# Altium PCB MainBoardPCB1.PcbDoc (part 27 of 40)
Units mm, origin at the board's own origin, x right, y up, seen from the top; angles counter-clockwise.
Board outline 258.95 x 308.86 mm, 16 copper layers (L1, L2 (GND), L3 (Sign), L4 (GND), L5 (Sign), L6 (PWR/GND), L7(PWR/GND), L8 (Plane_GND), L9 (PWR/GND), L10 (PWR/GND), L11 (PWR/GND), L12 (Sign), L13 (GND), L14 (Sign), L15 (GND), L16), stack 2.502 mm thick; 2397 components, 1744 nets, 8397 pads, 4112 vias.
Unrouted connection lines stored in the file: 3547.
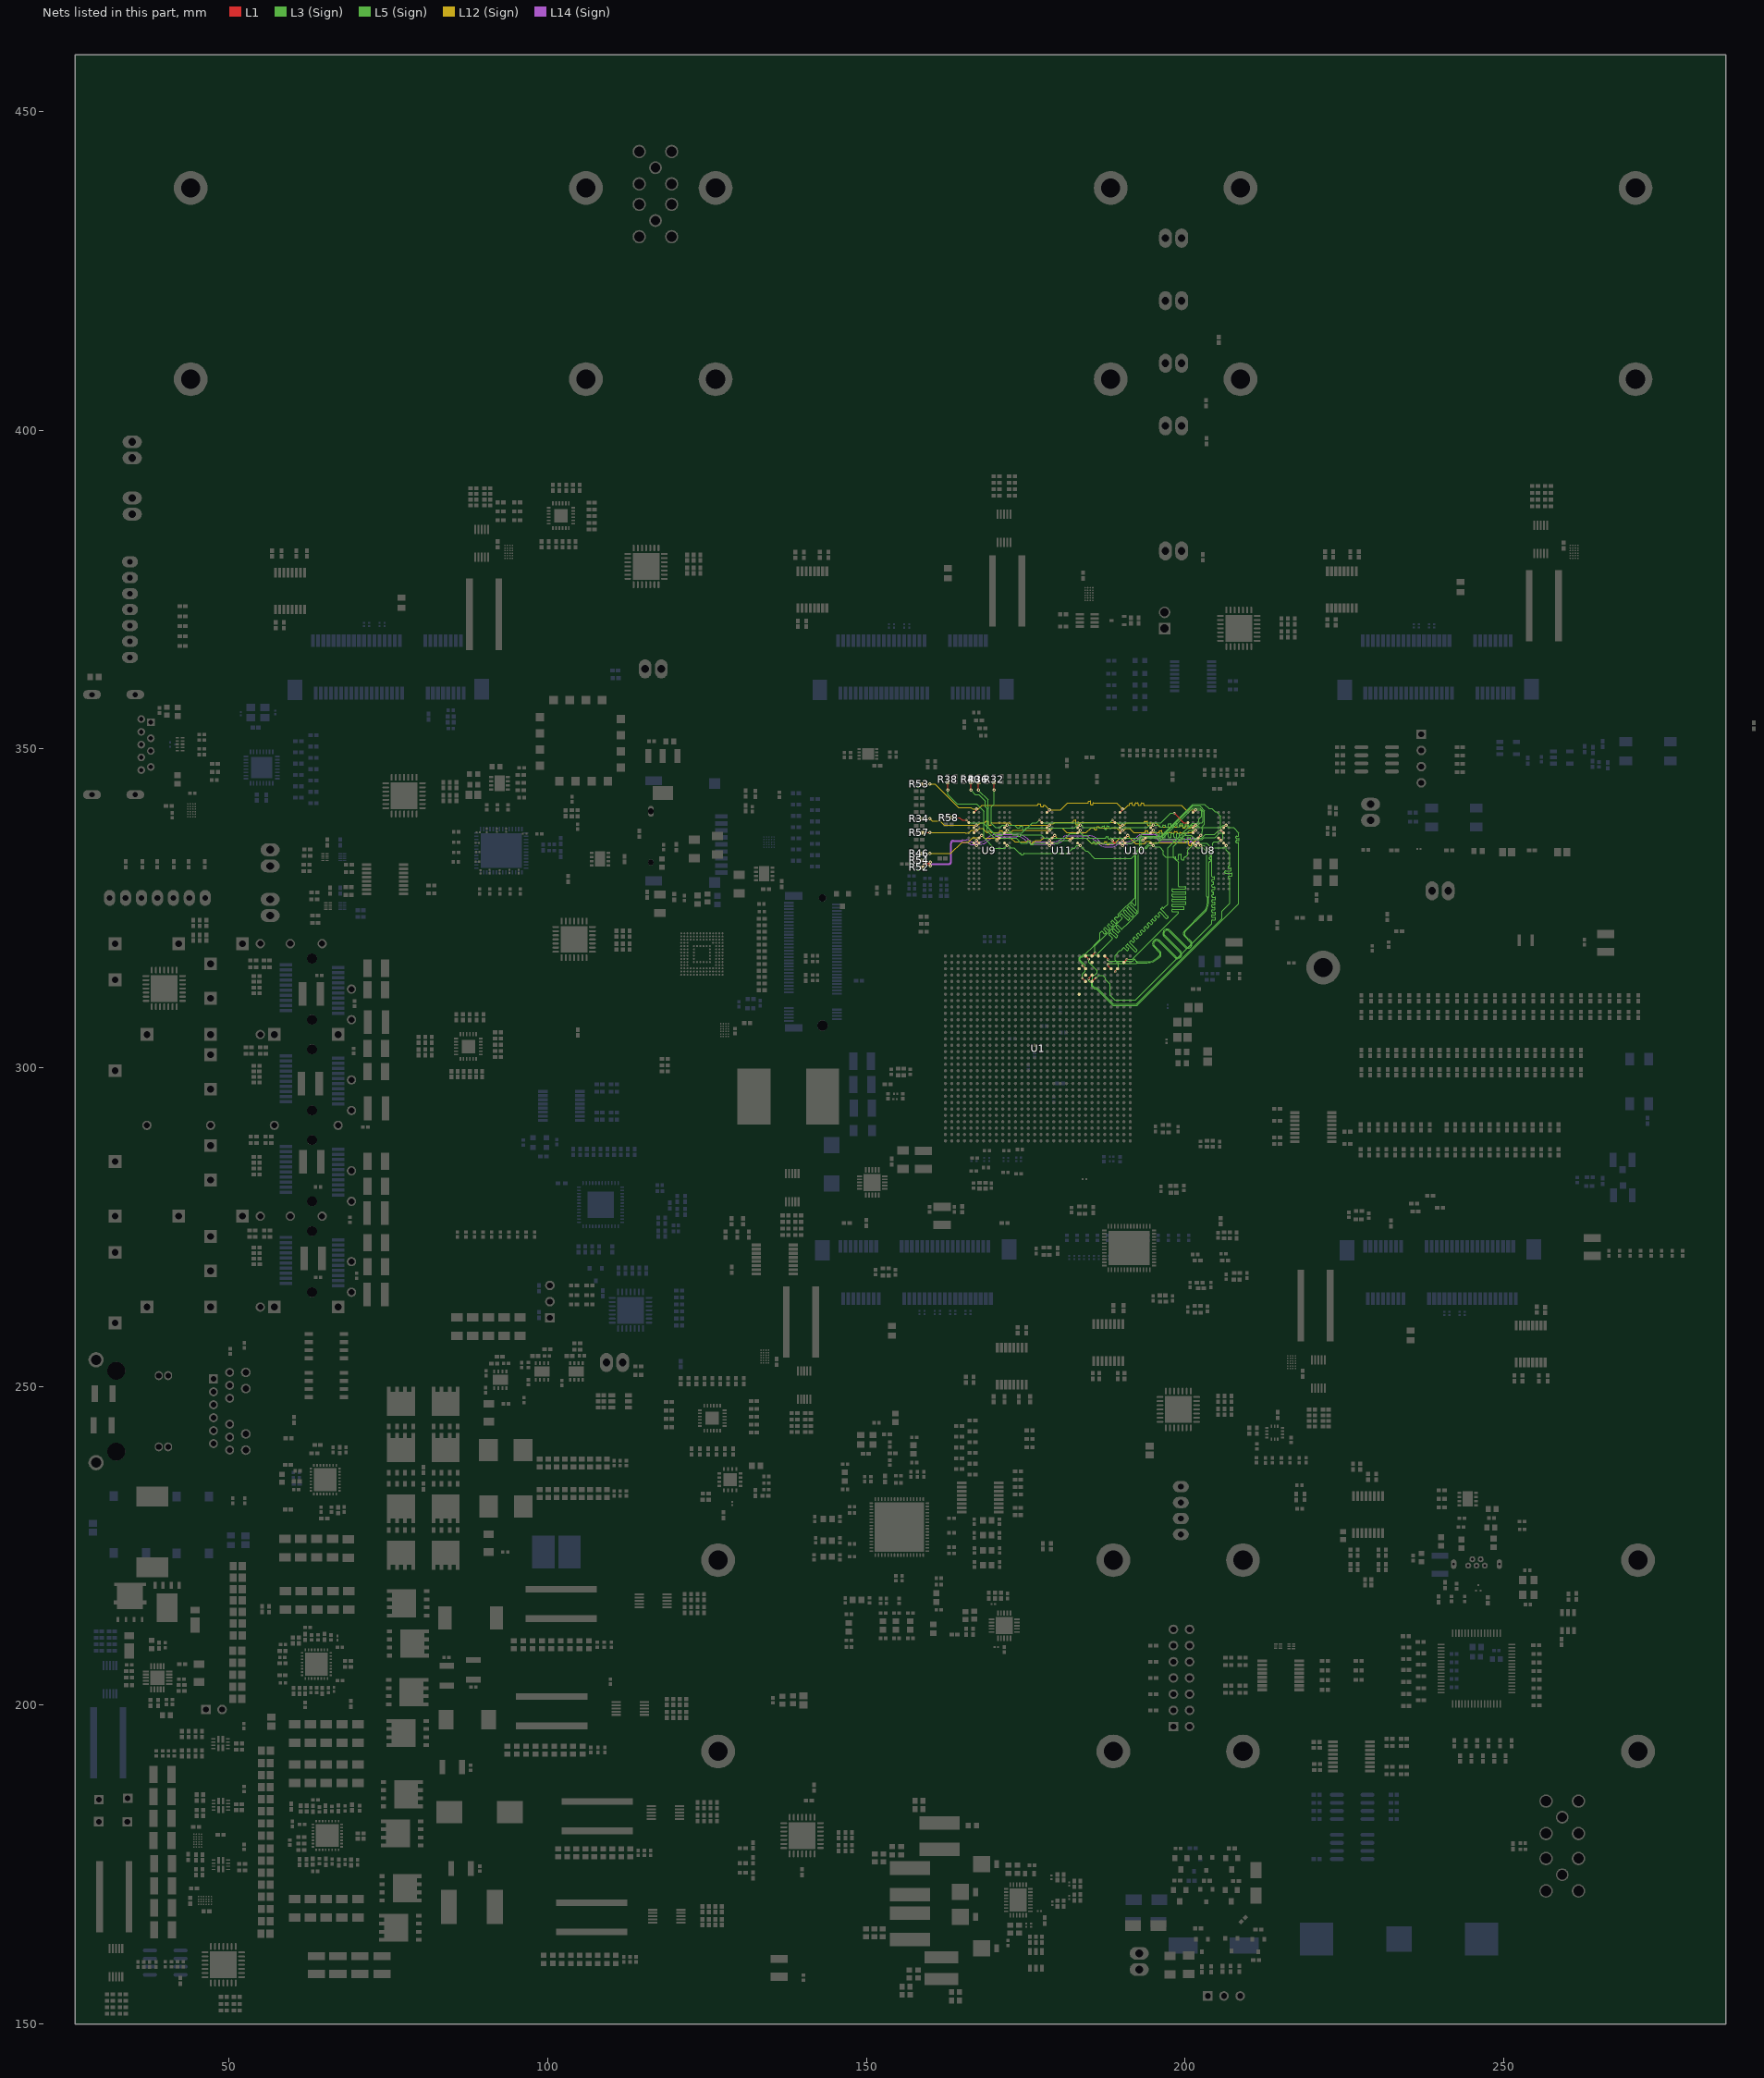
[diagram p27: the nets of this part, all layers, seen from the top]

## Via types
v1: diameter 0.5, hole 0.2, L1 to L16, tented both sides, 1457 vias
v2: diameter 0.35/0/0.35 (per signal layer), hole 0.127, L1 to L3 (Sign), tented both sides, 479 vias
v3: diameter 0.5/0.35/0.35/0.35/0.35/0.35/0.35/0.35/0.35/0.35/0.35/0.35/0.35/0.35/0.35/0.5 (per signal layer), hole 0.15, L1 to L16, tented both sides, 453 vias
v4: diameter 0.5, hole 0.2, L1 to L16, 451 vias
v5: diameter 0.5/0.35/0.35/0.35/0.35/0.35/0.35/0.35/0.35/0.35/0.35/0.35/0.35/0.35/0.35/0.5 (per signal layer), hole 0.2, L1 to L16, tented both sides, 373 vias
v6: diameter 0.8, hole 0.4, L1 to L16, tented both sides, 168 vias
v7: diameter 0.35/0/0.35 (per signal layer), hole 0.127, L1 to L3 (Sign), 138 vias
v8: diameter 2.54, hole 1.02, L1 to L16, 113 vias
v9: diameter 0.5/0/0.5 (per signal layer), hole 0.2, L14 (Sign) to L16, tented both sides, 102 vias
v10: diameter 1.4, hole 0.5, L1 to L16, tented both sides, 80 vias
v11: diameter 0.5, hole 0.2, L3 (Sign) to L6 (PWR/GND), tented both sides, 54 vias
v12: diameter 0.35, hole 0.127, L1 to L2 (GND), tented both sides, 47 vias
v13: diameter 0.4, hole 0.2, L1 to L16, tented both sides, 46 vias
v14: diameter 0.35, hole 0.127, L1 to L16, tented both sides, 16 vias
v15: diameter 0.25, hole 0.2, L1 to L16, 16 vias
v16: diameter 0.5, hole 0.2, L11 (PWR/GND) to L14 (Sign), tented both sides, 16 vias
v17: diameter 0.4, hole 0.2, L1 to L16, 16 vias
v18: diameter 0.3, hole 0.2, L1 to L16, 15 vias
v19: diameter 0.45, hole 0.15, L1 to L16, 12 vias
v20: diameter 0.5/0.35/0.35/0.35/0.35/0.35/0.35/0.35/0.35/0.35/0.35/0.35/0.35/0.35/0.35/0.45 (per signal layer), hole 0.15, L1 to L16, tented both sides, 10 vias
v21: diameter 0.2/0/0.2 (per signal layer), hole 0.1, L1 to L3 (Sign), tented both sides, 9 vias
v22: diameter 0.3, hole 0.127, L14 (Sign) to L16, tented both sides, 8 vias
v23: diameter 0.4, hole 0.1, L1 to L16, 7 vias
v24: diameter 1.15, hole 1.15, L1 to L16, 5 vias
v25: diameter 1.65, hole 1.65, L1 to L16, 5 vias
v26: diameter 0.2, hole 0.1, L1 to L16, 4 vias
v27: diameter 0.4, hole 0.15, L1 to L16, 2 vias
v28: diameter 0.5/0.35/0.35/0.35/0.35/0.35/0.35/0.35/0.35/0.35/0.35/0.35/0.35/0.35/0.35/0.5 (per signal layer), hole 0.15, L1 to L16, 2 vias
v29: diameter 0.35, hole 0.127, L3 (Sign) to L6 (PWR/GND), tented both sides, 2 vias
v30: diameter 0.3, hole 0.127, L15 (GND) to L16, tented both sides, 1 vias
v31: diameter 0.35, hole 0.127, L1 to L2 (GND), 1 vias
v32: diameter 0.5/0.35/0.35/0.35/0.35/0.35/0.35/0.35/0.35/0.35/0.35/0.35/0.35/0.35/0.35/0.5 (per signal layer), hole 0.2, L1 to L16, 1 vias
v33: diameter 0.35/0.35/0.35 (per signal layer), hole 0.127, L1 to L3 (Sign), tented both sides, 1 vias
v34: diameter 0.45/0/0.45 (per signal layer), hole 0.15, L1 to L3 (Sign), tented both sides, 1 vias
v35: diameter 0.45/0/0.45 (per signal layer), hole 0.2, L14 (Sign) to L16, tented both sides, 1 vias

## Nets (pads, with @x,y where several pads share a name; then routed paths per layer and width w, separated by ;. In a path a pad name is that pad's centre, name@x,y a point inside that pad or via, vN(x,y) a via of type N, cw(c..) or ccw(c..) an arc to the next point about the centre after c; other vN are vias at no path point) (continued)
DDR4_A13: R53.1 U1.AH28 U8.T5 U9.T5 U10.T5 U11.T5 | length 100.7
  L1 w0.116: U9.T5@166.876,340.06 167.274,340.459 v28(167.274,340.589) ; U11.T5@178.336,340.06 178.733,340.457 v3(178.735,340.457) ; v2(189.04,315.049) 189.04,315.182 U1.AH28@189.397,315.539 ; U10.T5@189.797,340.06 190.195,340.459 v3(190.195,340.589) ; U8.T5@201.257,340.06 201.653,340.457 v3(201.656,340.457)
  L1 w0.155: R53.1@158.737,344.5 v1(159.982,344.5)
  L12 (Sign) w0.092: 165.251,340.851 166.416,340.851 166.678,340.589 v28(167.274,340.589) 167.571,340.589 168.155,341.173 176.774,341.173 176.81,341.173 ccw(c176.81,341.262) 176.9,341.262 176.9,341.299 cw(c176.989,341.299) 176.989,341.389 177.258,341.389 cw(c177.258,341.299) 177.347,341.299 177.347,341.173 177.347,341.046 ccw(c177.437,341.046) 177.437,340.957 177.706,340.957 ccw(c177.706,341.046) 177.795,341.046 177.795,341.083 cw(c177.885,341.083) 177.885,341.173 178.019,341.173 v3(178.735,340.457) 180.475,340.457 181.559,341.541 184.15,341.541 184.793,341.541 ccw(c184.793,341.61) 184.862,341.61 184.862,341.755 cw(c184.931,341.755) 184.931,341.824 185.139,341.824 cw(c185.139,341.755) 185.208,341.755 185.208,341.541 185.208,341.327 ccw(c185.277,341.327) 185.277,341.258 185.485,341.258 ccw(c185.485,341.327) 185.554,341.327 185.554,341.472 cw(c185.624,341.472) 185.624,341.541 185.727,341.541 189.243,341.541 v3(190.195,340.589) 190.492,340.589 191.076,341.173 191.211,341.173 ccw(c191.211,341.262) 191.3,341.262 191.3,341.434 cw(c191.39,341.434) 191.39,341.523 191.658,341.523 cw(c191.658,341.434) 191.748,341.434 191.748,341.262 ccw(c191.838,341.262) 191.838,341.173 192.106,341.173 ccw(c192.106,341.262) 192.196,341.262 192.196,341.434 cw(c192.285,341.434) 192.285,341.523 192.554,341.523 cw(c192.554,341.434) 192.644,341.434 192.644,341.262 ccw(c192.733,341.262) 192.733,341.173 193.002,341.173 ccw(c193.002,341.262) 193.091,341.262 193.091,341.434 cw(c193.181,341.434) 193.181,341.523 193.45,341.523 cw(c193.45,341.434) 193.539,341.434 193.539,341.262 ccw(c193.629,341.262) 193.629,341.173 194.164,341.173 199.436,341.173 200.152,340.457 v3(201.656,340.457)
  L12 (Sign) w0.151: v1(159.982,344.5) 160.782,344.5 164.431,340.851 165.251,340.851
  L3 (Sign) w0.092: v2(189.04,315.049) 189.04,315.182 189.546,315.688 189.546,316.37 189.04,316.876 189.04,317.636 189.793,318.389 190.017,318.389 190.158,318.529 cw(c190.199,318.571) 190.158,318.612 190.355,318.81 cw(c190.397,318.769) 190.438,318.81 190.855,318.394 ccw(c190.925,318.464) 190.995,318.394 191.136,318.534 ccw(c191.065,318.604) 191.136,318.674 190.719,319.091 cw(c190.761,319.132) 190.719,319.174 190.917,319.372 cw(c190.958,319.33) 191,319.372 192.149,318.222 ccw(c192.22,318.292) 192.29,318.222 192.43,318.362 ccw(c192.36,318.433) 192.43,318.503 191.281,319.652 cw(c191.322,319.694) 191.281,319.735 191.478,319.933 cw(c191.52,319.891) 191.561,319.933 191.795,319.699 ccw(c191.866,319.769) 191.936,319.699 192.076,319.839 ccw(c192.006,319.909) 192.076,319.98 191.842,320.214 cw(c191.884,320.255) 191.842,320.297 192.04,320.494 cw(c192.081,320.453) 192.123,320.494 192.357,320.26 ccw(c192.427,320.33) 192.497,320.26 192.638,320.401 ccw(c192.567,320.471) 192.638,320.541 192.404,320.775 cw(c192.445,320.817) 192.404,320.858 192.601,321.056 cw(c192.643,321.014) 192.684,321.056 192.918,320.822 ccw(c192.989,320.892) 193.059,320.822 193.199,320.962 ccw(c193.129,321.032) 193.199,321.102 192.965,321.337 cw(c193.007,321.378) 192.965,321.42 193.163,321.617 cw(c193.204,321.576) 193.246,321.617 193.48,321.383 ccw(c193.55,321.453) 193.62,321.383 193.761,321.524 ccw(c193.69,321.594) 193.761,321.664 193.526,321.898 cw(c193.568,321.94) 193.526,321.981 193.724,322.179 cw(c193.766,322.137) 193.807,322.179 194.041,321.945 ccw(c194.111,322.015) 194.182,321.945 194.322,322.085 ccw(c194.252,322.155) 194.322,322.225 194.088,322.459 cw(c194.129,322.501) 194.088,322.543 194.285,322.74 cw(c194.327,322.699) 194.369,322.74 194.603,322.506 ccw(c194.673,322.576) 194.743,322.506 194.883,322.646 ccw(c194.813,322.717) 194.883,322.787 194.649,323.021 cw(c194.691,323.062) 194.649,323.104 194.847,323.302 cw(c194.888,323.26) 194.93,323.302 195.164,323.068 ccw(c195.234,323.138) 195.304,323.068 195.445,323.208 ccw(c195.375,323.278) 195.445,323.348 195.211,323.582 cw(c195.252,323.624) 195.211,323.665 195.408,323.863 cw(c195.45,323.821) 195.491,323.863 195.726,323.629 ccw(c195.796,323.699) 195.866,323.629 196.006,323.769 ccw(c195.936,323.84) 196.006,323.91 195.772,324.144 cw(c195.814,324.185) 195.772,324.227 195.97,324.424 cw(c196.011,324.383) 196.053,324.425 197.051,323.427 ccw(c197.121,323.497) 197.191,323.427 197.331,323.567 ccw(c197.261,323.637) 197.331,323.708 196.334,324.705 196.211,324.828 cw(c196.281,324.898) 196.211,324.968 196.351,325.109 cw(c196.421,325.039) 196.492,325.109 196.544,325.056 ccw(c196.614,325.126) 196.685,325.056 196.759,325.131 197.28,325.652 197.28,334.491 201.168,338.379 201.975,338.379 202.135,338.538 202.135,338.99 202.323,339.178 ; v3(201.656,340.457) 202.379,340.457 202.616,340.22 202.616,339.47 202.323,339.178
DDR4_ACT_N: R40.1 U1.AD26 U8.L3 U9.L3 U10.L3 U11.L3 | length 104
  L1 w0.116: v3(170.472,335.657) U9.L3@170.876,336.06 ; v3(181.933,335.657) U11.L3@182.336,336.06 ; U1.AD26@185.397,313.539 185.89,314.033 v2(186.017,314.033) ; v3(193.393,335.657) U10.L3@193.797,336.06 ; U8.L3@205.257,336.06 v20(205.661,335.657)
  L1 w0.155: v1(166.395,343.555) R40.1@166.395,344.799
  L5 (Sign) w0.092: 168.694,341.085 168.694,340.953 168.985,340.662 168.985,337.144 v3(170.472,335.657) 170.824,336.008 173.503,336.008 174.251,335.26 175.057,335.26 175.191,335.26 ccw(c175.191,335.35) 175.281,335.35 175.281,335.407 cw(c175.37,335.407) 175.37,335.497 175.639,335.497 cw(c175.639,335.407) 175.728,335.407 175.728,335.26 175.728,335.13 ccw(c175.818,335.13) 175.818,335.04 176.087,335.04 ccw(c176.087,335.13) 176.176,335.13 176.176,335.171 cw(c176.266,335.171) 176.266,335.26 176.657,335.26 180.028,335.26 180.425,335.657 v3(181.933,335.657) 182.336,336.06 184.472,336.06 185.265,335.267 185.356,335.267 185.46,335.267 ccw(c185.46,335.337) 185.53,335.337 185.53,335.406 cw(c185.599,335.406) 185.599,335.475 185.807,335.475 cw(c185.807,335.406) 185.876,335.406 185.876,335.267 185.876,335.129 ccw(c185.945,335.129) 185.945,335.059 186.153,335.059 ccw(c186.153,335.129) 186.222,335.129 186.222,335.267 186.222,335.406 cw(c186.291,335.406) 186.291,335.475 186.499,335.475 cw(c186.499,335.406) 186.568,335.406 186.568,335.337 ccw(c186.637,335.337) 186.637,335.267 186.715,335.267 191.656,335.267 192.045,335.657 v3(193.393,335.657) 193.816,336.08 195.631,336.08 195.885,335.826 197.417,335.826 198.076,335.826 cw(c198.076,335.737) 198.165,335.737 198.165,335.628 ccw(c198.255,335.628) 198.255,335.539 198.523,335.539 ccw(c198.523,335.628) 198.613,335.628 198.613,335.826 198.613,335.844 cw(c198.702,335.844) 198.702,335.933 198.971,335.933 cw(c198.971,335.844) 199.061,335.844 199.061,335.826 199.061,335.628 ccw(c199.15,335.628) 199.15,335.539 199.419,335.539 ccw(c199.419,335.628) 199.509,335.628 199.509,335.826 199.509,335.844 cw(c199.598,335.844) 199.598,335.933 199.867,335.933 cw(c199.867,335.844) 199.956,335.844 199.956,335.826 199.956,335.628 ccw(c200.046,335.628) 200.046,335.539 200.315,335.539 ccw(c200.315,335.628) 200.404,335.628 200.404,335.826 200.404,336.024 cw(c200.494,336.024) 200.494,336.113 200.762,336.113 cw(c200.762,336.024) 200.852,336.024 200.852,335.916 ccw(c200.941,335.916) 200.941,335.826 201.3,335.826 201.524,335.826 202.667,335.826 202.971,336.131 204.711,336.131 205.41,336.829 205.765,336.829 205.974,336.62 205.974,335.978 205.661,335.664 v20(205.661,335.657)
  L5 (Sign) w0.151: v1(166.395,343.555) 167.071,342.879 167.648,342.879 168.694,341.833 168.694,341.085
  L3 (Sign) w0.092: v2(186.017,314.033) 186.498,314.514 187.085,314.514 187.528,314.071 187.528,313.862 188.205,313.185 188.205,313.181 188.227,313.16 188.227,311.353 188.962,310.618 192.216,310.618 204.202,322.604 204.202,322.802 204.202,323.1 cw(c204.301,323.1) 204.301,323.199 204.674,323.199 ccw(c204.674,323.299) 204.774,323.299 204.774,323.497 ccw(c204.674,323.497) 204.674,323.596 204.301,323.596 cw(c204.301,323.696) 204.202,323.696 204.202,323.894 cw(c204.301,323.894) 204.301,323.993 204.674,323.993 ccw(c204.674,324.093) 204.774,324.093 204.774,324.291 ccw(c204.674,324.291) 204.674,324.39 204.301,324.39 cw(c204.301,324.49) 204.202,324.49 204.202,324.688 cw(c204.301,324.688) 204.301,324.787 204.6,324.787 ccw(c204.6,324.887) 204.699,324.887 204.699,325.085 ccw(c204.6,325.085) 204.6,325.184 204.301,325.184 cw(c204.301,325.284) 204.202,325.284 204.202,325.482 cw(c204.301,325.482) 204.301,325.581 204.6,325.581 ccw(c204.6,325.681) 204.699,325.681 204.699,325.879 ccw(c204.6,325.879) 204.6,325.978 204.301,325.978 cw(c204.301,326.078) 204.202,326.078 204.202,326.276 cw(c204.301,326.276) 204.301,326.375 204.674,326.375 ; 204.674,326.375 ccw(c204.674,326.475) 204.774,326.475 204.774,326.673 ccw(c204.674,326.673) 204.674,326.772 204.301,326.772 cw(c204.301,326.872) 204.202,326.872 204.202,327.07 cw(c204.301,327.07) 204.301,327.169 204.386,327.169 ccw(c204.386,327.269) 204.486,327.269 204.486,327.467 ccw(c204.386,327.467) 204.386,327.566 204.301,327.566 cw(c204.301,327.666) 204.202,327.666 204.202,327.864 cw(c204.301,327.864) 204.301,327.963 204.579,327.963 ccw(c204.579,328.063) 204.678,328.063 204.678,328.261 ccw(c204.579,328.261) 204.579,328.36 204.301,328.36 cw(c204.301,328.46) 204.202,328.46 204.202,328.658 cw(c204.301,328.658) 204.301,328.757 204.392,328.757 ccw(c204.392,328.857) 204.491,328.857 204.491,329.055 ccw(c204.392,329.055) 204.392,329.154 204.301,329.154 cw(c204.301,329.254) 204.202,329.254 204.202,329.452 cw(c204.301,329.452) 204.301,329.551 204.56,329.551 ccw(c204.56,329.651) 204.659,329.651 204.659,329.849 ccw(c204.56,329.849) 204.56,329.948 204.301,329.948 cw(c204.301,330.048) 204.202,330.048 204.202,332.168 204.202,334.623 204.349,334.771 204.349,335.21 204.584,335.445 205.207,335.445 205.418,335.657 v20(205.661,335.657)
DDR4_ALERT_N: R58.1 U1.AB24 U8.P6 U9.P6 U10.P6 U11.P6 | length 42.4
  L1 w0.112: 165.251,338.856 v2(165.665,338.856) ; U9.P6@166.061,338.46 U9.P6@166.076,338.46
  L1 w0.116: v2(165.665,338.856) U9.P6@166.061,338.46 ; v2@177.125,338.856 U11.P6@177.529,338.453 ; v2(188.586,338.856) U10.P6@188.989,338.453 ; v2(198.298,339.928) 199.766,338.46 U8.P6@200.457,338.46
  L1 w0.155: R58.1@163.36,339.242 164.63,339.242 165.016,338.856 165.251,338.856
  L3 (Sign) w0.092: v2(165.665,338.856) 166.061,338.46 168.322,338.46 169.953,336.829 174.409,336.829 176.04,338.46 176.721,338.46
  L3 (Sign) w0.116: 176.721,338.46 v2(177.117,338.857) 177.514,338.46 188.189,338.46 v2(188.586,338.856) 188.982,338.46 196.259,338.46 197.727,339.928 v2(198.298,339.928)
DDR4_BA0: R32.1 U1.AD27 U8.N2 U9.N2 U10.N2 U11.N2 | length 102.4
  L1 w0.116: U9.N2@171.676,337.66 v3(172.079,338.064) ; U11.N2@183.136,337.66 v3(183.54,338.064) ; v2(184.912,313.919) 184.912,314.054 U1.AD27@185.397,314.539 ; U10.N2@194.597,337.66 v3(195,338.064) ; U8.N2@206.057,337.66 v20(206.439,338.042)
  L1 w0.155: v1(170.02,343.555) R32.1@170.02,344.799
  L5 (Sign) w0.092: 169.765,341.085 169.569,340.89 169.569,338.367 170.243,337.693 170.626,337.693 170.996,337.693 171.367,338.064 v3(172.079,338.064) 173.24,338.064 173.687,337.617 173.876,337.617 174.01,337.617 ccw(c174.01,337.706) 174.1,337.706 174.1,337.818 cw(c174.189,337.818) 174.189,337.907 174.458,337.907 cw(c174.458,337.818) 174.547,337.818 174.547,337.617 174.547,337.416 ccw(c174.637,337.416) 174.637,337.326 174.906,337.326 ccw(c174.906,337.416) 174.995,337.416 174.995,337.527 cw(c175.085,337.527) 175.085,337.617 175.927,337.617 182.674,337.617 183.122,338.064 v3(183.54,338.064) 183.822,338.064 183.909,337.977 183.909,337.857 184.098,337.668 186.347,337.668 186.968,337.668 ccw(c186.968,337.737) 187.037,337.737 187.037,337.823 cw(c187.106,337.823) 187.106,337.892 187.314,337.892 cw(c187.314,337.823) 187.383,337.823 187.383,337.668 187.383,337.512 ccw(c187.453,337.512) 187.453,337.443 187.66,337.443 ccw(c187.66,337.512) 187.73,337.512 187.73,337.668 187.73,337.823 cw(c187.799,337.823) 187.799,337.892 188.006,337.892 cw(c188.006,337.823) 188.076,337.823 188.076,337.668 188.076,337.633 ccw(c188.145,337.633) 188.145,337.563 188.353,337.563 ccw(c188.353,337.633) 188.422,337.633 cw(c188.457,337.633) 188.457,337.668 188.595,337.668 194.056,337.668 194.452,338.064 v3(195,338.064) 195.313,338.064 195.952,338.064 cw(c195.952,337.974) 196.041,337.974 196.041,337.85 ccw(c196.131,337.85) 196.131,337.761 196.399,337.761 ccw(c196.399,337.85) 196.489,337.85 196.489,337.974 cw(c196.578,337.974) 196.578,338.064 196.847,338.064 cw(c196.847,337.974) 196.937,337.974 196.937,337.85 ccw(c197.026,337.85) 197.026,337.761 197.295,337.761 ccw(c197.295,337.85) 197.384,337.85 197.384,338.064 197.384,338.223 cw(c197.474,338.223) 197.474,338.312 197.743,338.312 cw(c197.743,338.223) 197.832,338.223 197.832,338.064 197.832,337.85 ccw(c197.922,337.85) 197.922,337.761 198.191,337.761 ccw(c198.191,337.85) 198.28,337.85 198.28,338.064 198.28,338.223 cw(c198.37,338.223) 198.37,338.312 198.638,338.312 cw(c198.638,338.223) 198.728,338.223 198.728,338.064 198.728,337.85 ccw(c198.817,337.85) 198.817,337.761 199.086,337.761 ccw(c199.086,337.85) 199.176,337.85 199.176,338.064 199.176,338.223 cw(c199.265,338.223) 199.265,338.312 199.534,338.312 cw(c199.534,338.223) 199.623,338.223 199.623,338.064 199.623,337.85 ccw(c199.713,337.85) 199.713,337.761 199.982,337.761 ccw(c199.982,337.85) 200.071,337.85 200.071,338.064 200.071,338.223 cw(c200.161,338.223) 200.161,338.312 200.43,338.312 cw(c200.43,338.223) 200.519,338.223 200.519,338.064 200.519,337.85 ccw(c200.609,337.85) 200.609,337.761 200.877,337.761 ccw(c200.877,337.85) 200.967,337.85 200.967,337.974 cw(c201.056,337.974) 201.056,338.064 201.191,338.064 201.587,337.668 201.752,337.668 ccw(c201.752,337.727) 201.811,337.727 cw(c201.9,337.727) 201.9,337.817 202.169,337.817 cw(c202.169,337.727) 202.258,337.727 ccw(c202.318,337.727) 202.318,337.668 202.654,337.668 205.646,337.668 206.02,338.042 v20(206.439,338.042)
  L5 (Sign) w0.151: 169.765,341.085 170.02,341.341 v1(170.02,343.555)
  L3 (Sign) w0.092: v2(184.912,313.919) 184.912,313.655 185.312,313.255 185.312,312.828 185.749,312.391 185.756,312.398 186.088,312.398 188.679,309.807 192.491,309.807 192.53,309.846 192.538,309.846 208.407,325.715 208.407,334.442 208.407,335.21 ccw(c208.32,335.21) 208.32,335.297 208.095,335.297 cw(c208.095,335.383) 208.008,335.383 208.008,335.557 cw(c208.095,335.557) 208.095,335.643 208.407,335.643 ccw(c208.407,335.708) 208.472,335.708 208.472,335.925 ccw(c208.407,335.925) 208.407,335.989 208.095,335.989 cw(c208.095,336.076) 208.008,336.076 208.008,336.249 cw(c208.095,336.249) 208.095,336.336 208.32,336.336 ccw(c208.32,336.422) 208.407,336.422 208.407,336.682 208.407,336.855 207.582,337.68 206.8,337.68 v20(206.439,338.042)
DDR4_BA1: R34.1 U1.AC26 U8.N5 U9.N5 U10.N5 U11.N5 | length 99
  L1 w0.116: U9.N5@166.876,337.66 167.272,338.057 v28(167.275,338.057) ; U11.N5@178.336,337.66 178.733,338.057 v3(178.735,338.057) ; v2(183.91,314.027) U1.AC26@184.397,313.539 ; U10.N5@189.797,337.66 190.193,338.057 v3(190.195,338.057) ; U8.N5@201.257,337.66 201.653,338.057 v3(201.656,338.057)
  L1 w0.155: R34.1@158.737,339.055 v1(159.982,339.056)
  L12 (Sign) w0.092: 165.251,338.057 166.745,338.057 v28(167.275,338.057) 167.511,338.057 167.915,338.46 168.465,338.46 168.6,338.46 ccw(c168.6,338.55) 168.689,338.55 168.689,338.564 cw(c168.779,338.564) 168.779,338.654 169.048,338.654 cw(c169.048,338.564) 169.137,338.564 169.137,338.46 169.137,338.144 ccw(c169.227,338.144) 169.227,338.054 169.495,338.054 ccw(c169.495,338.144) 169.585,338.144 169.585,338.371 cw(c169.675,338.371) 169.675,338.46 170.345,338.46 172.412,338.46 172.816,338.057 v3(178.735,338.057) 178.981,338.303 179.327,338.303 179.402,338.378 179.413,338.378 179.515,338.48 181.75,338.48 182.479,338.48 ccw(c182.479,338.55) 182.548,338.55 182.548,338.785 cw(c182.617,338.785) 182.617,338.854 182.825,338.854 cw(c182.825,338.785) 182.894,338.785 182.894,338.48 182.894,338.176 ccw(c182.963,338.176) 182.963,338.107 183.171,338.107 ccw(c183.171,338.176) 183.24,338.176 183.24,338.411 cw(c183.31,338.411) 183.31,338.48 183.413,338.48 189.243,338.48 189.666,338.057 v3(190.195,338.057) 190.458,338.057 190.805,338.404 191.783,338.404 193.558,338.404 ccw(c193.558,338.494) 193.648,338.494 193.648,338.57 cw(c193.737,338.57) 193.737,338.659 194.006,338.659 cw(c194.006,338.57) 194.096,338.57 194.096,338.404 194.096,338.145 ccw(c194.185,338.145) 194.185,338.055 194.454,338.055 ccw(c194.454,338.145) 194.543,338.145 194.543,338.315 cw(c194.633,338.315) 194.633,338.404 194.767,338.404 195.389,338.404 195.986,337.807 198.869,337.807 199.09,337.807 ccw(c199.09,337.87) 199.153,337.87 cw(c199.242,337.87) 199.242,337.96 199.511,337.96 cw(c199.511,337.87) 199.601,337.87 199.601,337.807 199.601,337.744 ccw(c199.69,337.744) 199.69,337.655 199.959,337.655 ccw(c199.959,337.744) 200.049,337.744 200.049,337.807 200.049,337.87 cw(c200.138,337.87) 200.138,337.96 200.407,337.96 cw(c200.407,337.87) 200.496,337.87 200.496,337.807 200.496,337.744 ccw(c200.586,337.744) 200.586,337.655 200.855,337.655 ccw(c200.855,337.744) 200.944,337.744 cw(c201.007,337.744) 201.007,337.807 201.168,337.807 201.418,338.057 v3(201.656,338.057)
  L12 (Sign) w0.151: v1(159.982,339.056) 160.336,338.702 161.577,338.702 162.221,338.057 165.251,338.057
  L3 (Sign) w0.092: v2(183.91,314.027) 183.91,314.68 184.362,315.132 184.362,316.073 183.563,316.872 183.563,317.185 183.751,317.373 183.934,317.373 184.164,317.603 184.62,317.603 184.723,317.707 185.751,317.707 ; 185.751,317.706 186.114,317.706 186.535,318.126 188.044,319.659 188.084,319.7 188.536,320.159 188.606,320.23 ccw(c188.535,320.299) 188.605,320.37 188.073,320.894 cw(c188.143,320.964) 188.072,321.034 188.211,321.175 cw(c188.282,321.106) 188.352,321.176 188.954,320.583 189.115,320.425 ccw(c189.185,320.496) 189.255,320.426 189.395,320.567 ccw(c189.324,320.637) 189.393,320.708 189.232,320.866 188.634,321.455 cw(c188.704,321.526) 188.633,321.595 188.773,321.737 cw(c188.843,321.667) 188.913,321.738 189.44,321.219 ccw(c189.51,321.29) 189.581,321.22 189.72,321.361 ccw(c189.649,321.431) 189.719,321.502 189.196,322.017 cw(c189.266,322.087) 189.195,322.157 189.334,322.298 cw(c189.405,322.229) 189.474,322.299 189.997,321.785 ccw(c190.067,321.855) 190.138,321.786 190.346,321.998 190.907,322.567 192.661,324.322 192.661,333.733 193.022,334.093 193.022,334.211 193.239,334.428 193.264,334.428 193.264,334.453 193.633,334.453 194.441,335.26 195.71,335.26 201.227,340.778 202.345,340.778 202.857,340.266 202.857,338.633 202.667,338.442 202.383,338.442 201.998,338.057 v3(201.656,338.057)
DDR4_BG0: R36.1 U1.AC28 U8.M2 U9.M2 U10.M2 U11.M2 | length 104.5
  L1 w0.116: U9.M2@171.676,336.86 v3(172.079,337.264) ; U11.M2@183.136,336.86 v3(183.54,337.264) ; v2(183.909,316.027) U1.AC28@184.397,315.539 ; U10.M2@194.597,336.86 v3(195,337.264) ; v20(205.684,337.233) U8.M2@206.057,336.86 U8.M2@206.088,336.829
  L1 w0.155: v1(167.603,343.555) R36.1@167.603,344.8
  L5 (Sign) w0.092: 169.102,341.085 169.102,340.891 169.177,340.816 169.177,337.543 170.231,336.488 171.303,336.488 v3(172.079,337.264) 172.324,337.264 173.043,336.545 173.609,336.545 173.708,336.545 cw(c173.708,336.445) 173.807,336.445 173.807,336.406 ccw(c173.907,336.406) 173.907,336.307 174.105,336.307 ccw(c174.105,336.406) 174.204,336.406 174.204,336.445 cw(c174.304,336.445) 174.304,336.545 175.12,336.545 177.437,336.545 177.921,336.06 181.217,336.06 181.292,336.136 181.922,336.766 183.042,336.766 v3(183.54,337.264) 183.54,336.919 183.998,336.461 184.595,336.461 184.996,336.06 186.741,336.06 187.533,336.06 ccw(c187.533,336.13) 187.603,336.13 187.603,336.176 cw(c187.672,336.176) 187.672,336.245 187.879,336.245 cw(c187.879,336.176) 187.949,336.176 187.949,336.06 187.949,335.991 ccw(c188.018,335.991) 188.018,335.922 188.226,335.922 ccw(c188.226,335.991) 188.295,335.991 cw(c188.364,335.991) 188.364,336.06 188.468,336.06 192.677,336.06 193.383,336.766 194.502,336.766 v3(195,337.264) 195.79,336.474 195.925,336.474 ccw(c195.925,336.563) 196.014,336.563 196.014,336.726 cw(c196.104,336.726) 196.104,336.816 196.373,336.816 cw(c196.373,336.726) 196.462,336.726 196.462,336.474 196.462,336.221 ccw(c196.552,336.221) 196.552,336.131 196.82,336.131 ccw(c196.82,336.221) 196.91,336.221 196.91,336.474 196.91,336.65 cw(c197,336.65) 197,336.739 197.268,336.739 cw(c197.268,336.65) 197.358,336.65 197.358,336.474 197.358,336.221 ccw(c197.447,336.221) 197.447,336.131 197.716,336.131 ccw(c197.716,336.221) 197.806,336.221 197.806,336.474 197.806,336.65 cw(c197.895,336.65) 197.895,336.739 198.164,336.739 cw(c198.164,336.65) 198.253,336.65 198.253,336.474 198.253,336.221 ccw(c198.343,336.221) 198.343,336.131 198.612,336.131 ccw(c198.612,336.221) 198.701,336.221 198.701,336.474 198.701,336.65 cw(c198.791,336.65) 198.791,336.739 199.059,336.739 cw(c199.059,336.65) 199.149,336.65 199.149,336.474 199.149,336.221 ccw(c199.239,336.221) 199.239,336.131 199.507,336.131 ccw(c199.507,336.221) 199.597,336.221 199.597,336.474 199.597,336.726 cw(c199.686,336.726) 199.686,336.816 199.955,336.816 cw(c199.955,336.726) 200.045,336.726 200.045,336.563 ccw(c200.134,336.563) 200.134,336.474 200.952,336.474 200.965,336.474 201.378,336.061 202.045,336.061 202.619,336.061 203.161,336.602 204.649,336.602 205.28,337.233 v20(205.684,337.233)
  L5 (Sign) w0.151: v1(167.603,343.555) 167.603,343.534 169.102,342.035 169.102,341.085
  L3 (Sign) w0.092: v2(183.909,316.027) 183.909,316.254 183.371,316.792 183.371,317.264 183.672,317.565 183.854,317.565 184.084,317.795 184.327,317.795 185.692,319.16 185.692,319.238 186.638,320.183 186.638,321.172 186.846,321.38 cw(c186.916,321.309) 186.986,321.38 187.332,321.033 ccw(c187.403,321.103) 187.473,321.033 187.613,321.173 ccw(c187.543,321.244) 187.613,321.314 187.267,321.66 cw(c187.337,321.731) 187.267,321.801 187.407,321.941 cw(c187.477,321.871) 187.547,321.941 187.894,321.595 ccw(c187.964,321.665) 188.034,321.595 188.175,321.735 ccw(c188.104,321.805) 188.175,321.875 187.828,322.222 cw(c187.898,322.292) 187.828,322.362 ; 187.828,322.362 187.968,322.503 cw(c188.039,322.432) 188.109,322.503 188.455,322.156 ccw(c188.526,322.226) 188.596,322.156 188.736,322.296 ccw(c188.666,322.367) 188.736,322.437 188.389,322.783 cw(c188.46,322.853) 188.389,322.924 188.53,323.064 cw(c188.6,322.994) 188.67,323.064 189.017,322.717 ccw(c189.087,322.788) 189.157,322.717 189.298,322.858 ccw(c189.227,322.928) 189.298,322.998 188.951,323.345 cw(c189.021,323.415) 188.951,323.485 189.091,323.625 cw(c189.161,323.555) 189.232,323.625 189.277,323.58 ccw(c189.347,323.651) 189.417,323.58 189.557,323.721 ccw(c189.487,323.791) 189.557,323.861 189.512,323.906 cw(c189.583,323.976) 189.512,324.047 189.583,324.117 192.129,326.663 192.129,333.743 192.638,334.252 192.638,334.484 192.862,334.708 192.862,335.892 193.266,336.296 196.202,336.296 201.206,341.3 203.073,341.3 203.733,340.639 204.224,340.639 204.72,340.143 204.903,340.143 205.58,339.466 205.58,337.579 205.621,337.538 205.621,337.296 v20(205.684,337.233)
DDR4_BG1: U1.AC27
DDR4_CAS: R57.1 U1.AJ29 U8.M5 U9.M5 U10.M5 U11.M5 | length 98.2
  L1 w0.116: U9.M5@166.876,336.86 167.272,337.257 v3(167.275,337.257) ; U11.M5@178.336,336.86 178.733,337.257 v3(178.735,337.257) ; U10.M5@189.797,336.86 190.193,337.257 v3(190.195,337.257) ; U1.AJ29@190.397,316.539 v2(190.884,317.027) ; U8.M5@201.257,336.86 201.259,336.86 v3(201.656,337.257)
  L1 w0.155: R57.1@158.737,336.878 v1(159.982,336.878)
  L12 (Sign) w0.092: 165.251,336.878 165.496,336.878 165.519,336.855 166.07,336.855 166.472,337.257 166.72,337.257 v3(167.275,337.257) 167.486,337.257 167.807,337.578 168.208,337.578 168.878,336.907 169.013,336.907 ccw(c169.013,336.997) 169.102,336.997 169.102,337.062 cw(c169.192,337.062) 169.192,337.152 169.46,337.152 cw(c169.46,337.062) 169.55,337.062 169.55,336.997 ccw(c169.64,336.997) 169.64,336.907 169.672,336.907 170.688,336.907 170.822,336.907 ccw(c170.822,336.997) 170.912,336.997 170.912,337.1 cw(c171.001,337.1) 171.001,337.189 171.27,337.189 cw(c171.27,337.1) 171.36,337.1 171.36,336.997 ccw(c171.449,336.997) 171.449,336.907 171.952,336.907 172.661,336.907 173.01,337.257 v3(178.735,337.257) 178.911,337.257 179.248,337.593 180.711,337.593 181.424,336.88 184.497,336.88 185.277,337.66 185.45,337.66 185.727,337.66 cw(c185.727,337.591) 185.797,337.591 185.797,337.419 ccw(c185.866,337.419) 185.866,337.35 186.074,337.35 ccw(c186.074,337.419) 186.143,337.419 186.143,337.66 186.143,337.741 cw(c186.212,337.741) 186.212,337.81 186.42,337.81 cw(c186.42,337.741) 186.489,337.741 186.489,337.73 ccw(c186.558,337.73) 186.558,337.66 186.665,337.66 189.237,337.66 189.641,337.257 v3(190.195,337.257) 190.407,337.257 190.728,337.578 190.862,337.578 191.128,337.578 191.275,337.578 191.946,336.907 193.52,336.907 193.654,336.907 ccw(c193.654,336.997) 193.744,336.997 193.744,337.087 cw(c193.833,337.087) 193.833,337.177 194.102,337.177 cw(c194.102,337.087) 194.192,337.087 194.192,336.907 ccw(c194.281,336.907) 194.281,336.818 194.55,336.818 ccw(c194.55,336.907) 194.639,336.907 194.639,336.877 cw(c194.669,336.877) 194.669,336.907 195,336.907 195.047,336.907 195.631,336.907 195.844,336.907 ccw(c195.844,336.997) 195.934,336.997 195.934,337.081 cw(c196.023,337.081) 196.023,337.171 196.292,337.171 cw(c196.292,337.081) 196.382,337.081 196.382,336.907 196.382,336.877 ccw(c196.471,336.877) 196.471,336.787 196.74,336.787 ccw(c196.74,336.877) 196.829,336.877 cw(c196.859,336.877) 196.859,336.907 197.053,336.907 197.432,336.907 197.85,336.907 cw(c197.85,336.877) 197.88,336.877 ccw(c197.969,336.877) 197.969,336.787 198.238,336.787 ccw(c198.238,336.877) 198.327,336.877 198.327,336.907 198.327,336.987 cw(c198.417,336.987) 198.417,337.077 198.686,337.077 cw(c198.686,336.987) 198.775,336.987 198.775,336.907 198.775,336.877 ccw(c198.865,336.877) 198.865,336.787 199.133,336.787 ccw(c199.133,336.877) 199.223,336.877 cw(c199.253,336.877) 199.253,336.907 199.641,336.907 cw(c199.641,336.877) 199.671,336.877 ccw(c199.76,336.877) 199.76,336.787 200.029,336.787 ccw(c200.029,336.877) 200.119,336.877 cw(c200.149,336.877) 200.149,336.907 200.343,336.907 200.979,336.907 201.329,337.257 v3(201.656,337.257)
  L12 (Sign) w0.151: v1(159.982,336.878) 165.251,336.878
  L3 (Sign) w0.092: v2(190.884,317.027) 191.737,317.027 191.8,317.09 198.886,324.176 198.984,324.273 198.984,324.372 ccw(c198.884,324.372) 198.884,324.471 198.047,324.471 cw(c198.047,324.571) 197.947,324.571 197.947,324.769 cw(c198.047,324.769) 198.047,324.868 198.984,324.868 199.775,324.868 ccw(c199.775,324.968) 199.874,324.968 199.874,325.166 ccw(c199.775,325.166) 199.775,325.265 198.984,325.265 198.047,325.265 cw(c198.047,325.365) 197.947,325.365 197.947,325.563 cw(c198.047,325.563) 198.047,325.662 198.984,325.662 200.037,325.662 ccw(c200.037,325.762) 200.136,325.762 200.136,325.96 ccw(c200.037,325.96) 200.037,326.059 198.984,326.059 198.047,326.059 cw(c198.047,326.159) 197.947,326.159 197.947,326.357 cw(c198.047,326.357) 198.047,326.456 198.984,326.456 200.037,326.456 ccw(c200.037,326.556) 200.136,326.556 200.136,326.754 ccw(c200.037,326.754) 200.037,326.853 198.984,326.853 198.047,326.853 cw(c198.047,326.953) 197.947,326.953 197.947,327.151 cw(c198.047,327.151) 198.047,327.25 198.984,327.25 200.037,327.25 ccw(c200.037,327.35) 200.136,327.35 200.136,327.548 ccw(c200.037,327.548) 200.037,327.647 198.984,327.647 198.047,327.647 cw(c198.047,327.747) 197.947,327.747 197.947,327.945 cw(c198.047,327.945) 198.047,328.044 198.984,328.044 200.01,328.044 ccw(c200.01,328.144) 200.109,328.144 200.109,328.342 ccw(c200.01,328.342) 200.01,328.441 199.015,328.441 cw(c199.015,328.473) 198.984,328.473 198.947,328.509 198.947,332.226 198.477,332.696 198.477,332.709 198.216,332.97 198.207,332.97 198.207,334.741 200.724,337.257 v3(201.656,337.257)
DDR4_CK0: U1.AE30
DDR4_CK1: U1.AF28
DDR4_CK_N: R52.1 U1.AF30 U8.K5 U9.K5 U10.K5 U11.K5 | length 101.2
  L1 w0.1: R52.1@158.737,331.433 ccw(c158.617,331.554) 158.787,331.554 cw(c159.103,331.554) 159.103,331.87 159.828,331.87 cw(c159.828,331.677) v1(160.02,331.677) ; U1.AF30@187.397,317.539 187.87,317.066 v13(187.87,316.954) ; U8.K5@201.257,335.26 v3@201.653,334.864
  L1 w0.116: U9.K5@166.876,335.26 v3(167.279,334.857) ; U11.K5@178.336,335.26 v3(178.74,334.857) ; U10.K5@189.797,335.26 v3(190.2,334.857) ; v3(201.653,334.862) v3@201.653,334.864
  L5 (Sign) w0.1: v13(187.87,316.954) ccw(c188.076,316.954) 188.076,316.748 191.719,316.748 191.771,316.748 ccw(c191.771,316.842) 191.866,316.842 cw(c192.025,316.842) 192.025,317.002 192.06,317.002 cw(c192.06,316.842) 192.22,316.842 ccw(c192.314,316.842) 192.314,316.748 192.397,316.748 ccw(c192.491,316.748) 192.491,316.654 194.024,316.654 ccw(c194.024,319.194) 195.82,317.397 195.957,317.534 ccw(c195.656,317.835) 196.081,317.835 ccw(c195.656,317.835) 195.957,318.135 195.051,319.041 cw(c195.475,319.464) 195.051,319.888 195.132,319.968 cw(c195.555,319.545) 195.979,319.968 198.514,317.433 ccw(c198.815,317.733) 199.115,317.433 199.196,317.513 ccw(c198.895,317.814) 199.32,317.814 ccw(c198.895,317.814) 199.196,318.114 196.66,320.65 cw(c197.084,321.073) 196.66,321.497 196.741,321.577 cw(c197.164,321.154) 197.588,321.577 200.123,319.042 ccw(c200.424,319.343) 200.724,319.042 200.805,319.122 ccw(c200.504,319.423) 200.929,319.423 ccw(c200.504,319.423) 200.805,319.723 199.899,320.629 cw(c200.323,321.053) 199.899,321.476 202.984,324.561 ccw(c201.696,325.849) 203.517,325.849 203.517,326.785 cw(c203.517,326.88) 203.423,326.88 203.423,333.541 ccw(c202.526,333.541) 203.161,334.175 202.938,334.398 ccw(c202.755,334.215) 202.755,334.473 202.042,334.473 cw(c202.042,334.862) v3(201.653,334.862)
  L14 (Sign) w0.1: v1(160.02,331.677) 160.02,331.877 160.42,331.877 160.42,331.89 162.939,331.89 ccw(c162.939,332.325) 163.373,332.325 163.373,335.242 cw(c163.639,335.242) 163.639,335.508 165.001,335.508 ccw(c165.095,335.508) 165.095,335.414 165.705,335.414 cw(c165.705,334.89) 166.076,335.26 166.078,335.259 ccw(c166.599,335.78) 166.599,335.043 167.165,335.043 cw(c167.165,334.928) 167.279,334.928 v3(167.279,334.857) cw(c167.502,334.857) 167.502,335.079 167.918,335.079 ccw(c167.918,336.552) 168.959,335.511 169.026,335.578 cw(c170.687,333.917) 170.687,336.265 173.561,336.265 cw(c173.561,334.243) 174.991,335.673 ; 174.992,335.672 ccw(c176.424,337.105) 176.424,335.079 178.517,335.079 cw(c178.517,334.857) v3(178.74,334.857) cw(c178.966,334.857) 178.966,335.083 179.306,335.083 ccw(c179.306,337.44) 180.972,335.773 181.068,335.869 cw(c181.47,335.466) 181.47,336.035 184.593,336.035 184.594,336.037 184.767,336.037 cw(c184.767,334.213) 186.057,335.503 186.427,335.132 ccw(c187.589,336.294) 187.589,334.651 188.563,334.651 ccw(c188.563,335.494) 189.159,334.898 189.16,334.899 cw(c189.595,334.464) 189.595,335.079 189.978,335.079 cw(c189.978,334.857) v3(190.2,334.857) 190.2,334.92 cw(c190.36,334.92) 190.36,335.08 190.721,335.08 ccw(c190.721,337.822) 192.66,335.883 192.857,336.08 cw(c193.256,335.682) 193.256,336.245 194.894,336.245 cw(c194.894,335.261) 195.59,335.957 195.743,335.804 ccw(c196.487,336.547) 196.487,335.496 199.822,335.496 199.84,335.496 cw(c199.84,335.41) 199.926,335.41 ccw(c200.062,335.41) 200.062,335.274 200.092,335.274 ccw(c200.092,335.41) 200.229,335.41 cw(c200.314,335.41) 200.314,335.496 200.381,335.496 cw(c200.381,335.418) 200.459,335.418 200.459,335.41 ccw(c200.595,335.41) 200.595,335.274 200.626,335.274 ccw(c200.626,335.41) 200.762,335.41 cw(c200.848,335.41) 200.848,335.496 200.914,335.496 200.964,335.496 cw(c200.964,335.36) 201.1,335.36 ccw(c201.236,335.36) 201.236,335.223 201.267,335.223 ccw(c201.267,335.36) 201.403,335.36 cw(c201.539,335.36) 201.539,335.496 201.555,335.496 cw(c201.555,335.178) 201.872,335.178 201.872,335.08 cw(c201.653,335.08) v3(201.653,334.862)
DDR4_CK_P: R54.1 U1.AG28 U8.K4 U9.K4 U10.K4 U11.K4 | length 101.5
  L1 w0.1: R54.1@158.737,332.522 cw(c158.617,332.401) 158.787,332.401 ccw(c159.103,332.401) 159.103,332.085 159.828,332.085 ccw(c159.828,332.277) v1(160.02,332.277) ; v13(187.897,316.179) 187.897,316.04 U1.AG28@188.397,315.539 ; U8.K4@202.057,335.26 v3@202.453,334.864
  L1 w0.116: v3(167.272,335.664) U9.K4@167.676,335.26 ; v3(178.733,335.664) U11.K4@179.136,335.26 ; v3(190.193,335.664) U10.K4@190.597,335.26 ; v3(202.453,334.862) v3@202.453,334.864
  L5 (Sign) w0.1: v13(187.897,316.179) cw(c188.103,316.179) 188.103,316.385 192.397,316.385 cw(c192.491,316.385) 192.491,316.48 194.025,316.48 ccw(c194.025,319.192) 195.943,317.274 196.08,317.411 ccw(c195.656,317.835) 196.255,317.835 ccw(c195.656,317.835) 196.08,318.258 195.174,319.164 cw(c195.475,319.464) 195.174,319.765 195.255,319.845 cw(c195.555,319.545) 195.856,319.845 198.391,317.31 ccw(c198.815,317.733) 199.238,317.31 199.319,317.39 ccw(c198.895,317.814) 199.494,317.814 ccw(c198.895,317.814) 199.319,318.237 196.783,320.773 cw(c197.084,321.073) 196.783,321.374 196.864,321.454 cw(c197.164,321.154) 197.465,321.454 200,318.919 ccw(c200.424,319.343) 200.847,318.919 200.928,318.999 ccw(c200.504,319.423) 201.103,319.423 ccw(c200.504,319.423) 200.928,319.847 200.022,320.752 cw(c200.323,321.053) 200.022,321.353 203.108,324.439 ccw(c201.698,325.848) 203.691,325.848 203.691,326.785 ccw(c203.691,326.88) 203.786,326.88 203.786,332.194 203.786,332.266 cw(c203.88,332.266) 203.88,332.361 ccw(c203.88,332.52) 204.04,332.52 204.04,332.556 ccw(c203.88,332.556) 203.88,332.715 cw(c203.88,332.81) 203.786,332.81 203.786,332.892 203.786,332.917 cw(c203.88,332.917) 203.88,333.011 ccw(c203.88,333.171) 204.04,333.171 204.04,333.206 ccw(c203.88,333.206) 203.88,333.365 cw(c203.88,333.46) 203.786,333.46 203.786,333.542 ccw(c202.53,333.542) 203.418,334.43 203.193,334.655 ccw(c202.757,334.22) 202.757,334.835 202.48,334.835 cw(c202.48,334.862) v3(202.453,334.862)
  L14 (Sign) w0.1: v1(160.02,332.277) 160.02,332.077 160.42,332.077 160.42,332.064 162.939,332.064 ccw(c162.939,332.325) 163.199,332.325 163.199,335.242 cw(c163.639,335.242) 163.639,335.682 165.001,335.682 cw(c165.095,335.682) 165.095,335.776 165.708,335.776 cw(c165.708,334.898) 166.33,335.519 166.332,335.517 ccw(c166.601,335.786) 166.601,335.405 167.165,335.405 ccw(c167.165,335.512) 167.272,335.512 v3(167.272,335.664) ccw(c167.495,335.664) 167.495,335.441 167.917,335.441 ccw(c167.917,336.555) 168.704,335.768 168.771,335.835 cw(c170.686,333.92) 170.686,336.628 173.564,336.628 cw(c173.564,334.249) 175.245,335.931 175.247,335.929 ccw(c176.424,337.106) 176.424,335.441 178.51,335.441 ccw(c178.51,335.664) v3(178.733,335.664) ccw(c178.951,335.664) 178.951,335.445 179.302,335.445 ccw(c179.302,337.449) 180.719,336.032 180.813,336.126 cw(c181.468,335.472) 181.468,336.398 184.231,336.398 184.232,336.399 184.917,336.399 cw(c184.917,334.575) 186.207,335.865 186.681,335.39 ccw(c187.592,336.301) 187.592,335.013 188.561,335.013 ccw(c188.561,335.497) 188.904,335.155 188.905,335.156 cw(c189.594,334.467) 189.594,335.441 189.971,335.441 ccw(c189.971,335.664) v3(190.193,335.664) 190.193,335.609 ccw(c190.36,335.609) 190.36,335.442 190.655,335.442 ccw(c190.655,337.982) 192.451,336.186 192.602,336.337 cw(c193.254,335.685) 193.254,336.607 194.896,336.607 cw(c194.896,335.266) 195.845,336.214 195.999,336.06 ccw(c196.487,336.549) 196.487,335.858 200.952,335.858 201.014,335.858 ccw(c201.014,335.944) 201.1,335.944 cw(c201.236,335.944) 201.236,336.08 201.267,336.08 cw(c201.267,335.944) 201.403,335.944 ccw(c201.489,335.944) 201.489,335.858 201.555,335.858 cw(c201.555,335.178) 202.235,335.178 202.235,335.08 ; 202.235,335.028 202.235,335.08 ; v3(202.453,334.862) cw(c202.453,335.08) 202.235,335.08
DDR4_CKE0: R38.1 U1.AC30 U8.K2 U9.K2 U10.K2 U11.K2 | length 110.3
  L1 w0.116: U9.K2@171.676,335.26 v3(172.079,334.857) ; U11.K2@183.136,335.26 v3(183.54,334.857) ; U1.AC30@184.397,317.539 v2(184.884,317.052) ; U10.K2@194.597,335.26 v3(195,334.857) ; U8.K2@206.057,335.26 v20(206.461,334.857)
  L1 w0.155: v1(162.769,343.555) R38.1@162.769,344.8
  L5 (Sign) w0.092: 167.571,341.085 168.41,340.246 168.41,336.122 170.071,334.46 171.683,334.46 v3(172.079,334.857) 172.333,334.857 172.675,334.515 173.142,334.515 173.997,333.66 174.131,333.66 cw(c174.131,333.571) 174.221,333.571 174.221,333.511 ccw(c174.31,333.511) 174.31,333.422 174.579,333.422 ccw(c174.579,333.511) 174.668,333.511 174.668,333.571 cw(c174.758,333.571) 174.758,333.66 175.73,333.66 181.536,333.66 182.336,334.46 182.629,334.46 183.025,334.857 v3(183.54,334.857) 184.385,334.012 184.654,334.012 185.805,332.86 191.573,332.86 193.173,334.46 193.955,334.46 194.352,334.857 v3(195,334.857) 195.07,334.857 195.249,334.677 195.971,334.677 196.613,334.035 196.613,333.411 196.954,333.07 198.216,333.07 198.444,333.07 cw(c198.444,332.981) 198.534,332.981 198.534,332.734 ccw(c198.623,332.734) 198.623,332.644 198.892,332.644 ccw(c198.892,332.734) 198.982,332.734 198.982,333.07 198.982,333.407 cw(c199.071,333.407) 199.071,333.496 199.34,333.496 cw(c199.34,333.407) 199.43,333.407 199.43,333.07 199.43,332.734 ccw(c199.519,332.734) 199.519,332.644 199.788,332.644 ccw(c199.788,332.734) 199.877,332.734 199.877,332.981 cw(c199.967,332.981) 199.967,333.07 200.101,333.07 200.416,333.385 200.416,334.158 201.508,335.25 203.375,335.25 204.146,334.48 206.084,334.48 v20(206.461,334.857)
  L5 (Sign) w0.151: v1(162.769,343.555) 162.769,342.831 164.224,341.376 167.28,341.376 167.571,341.085
  L3 (Sign) w0.092: v2(184.884,317.052) 184.884,316.531 186.231,315.185 186.231,314.919 185.857,314.546 185.678,314.546 185.504,314.372 185.504,312.908 185.822,312.59 186.168,312.59 188.759,309.999 192.411,309.999 192.45,310.038 192.458,310.038 205.797,323.376 205.797,324.587 207.05,325.839 207.05,329.514 207.05,329.613 ccw(c206.95,329.613) 206.95,329.713 206.939,329.713 cw(c206.939,329.812) 206.84,329.812 206.84,330.01 cw(c206.939,330.01) 206.939,330.11 207.05,330.11 207.306,330.11 ccw(c207.306,330.209) 207.405,330.209 207.405,330.407 ccw(c207.306,330.407) 207.306,330.507 207.05,330.507 206.358,330.507 cw(c206.358,330.606) 206.259,330.606 206.259,330.804 cw(c206.358,330.804) 206.358,330.904 207.05,330.904 207.166,330.904 ccw(c207.166,331.003) 207.265,331.003 207.265,331.201 ccw(c207.166,331.201) 207.166,331.301 207.05,331.301 206.938,331.301 cw(c206.938,331.4) 206.839,331.4 206.839,331.598 cw(c206.938,331.598) 206.938,331.698 206.95,331.698 ccw(c206.95,331.797) 207.05,331.797 207.05,333.438 207.05,333.539 206.461,334.128 v20(206.461,334.857)
DDR4_CKE1: U1.AB28
DDR4_CS_B: R46.1 U1.AD30 U8.L4 U9.L4 U10.L4 U11.L4 | length 101.1
  L1 w0.116: U9.L4@167.676,336.06 168.072,336.457 v3(168.075,336.457) ; U11.L4@179.136,336.06 179.533,336.457 v3(179.535,336.457) ; U1.AD30@185.397,317.539 v2(185.884,318.027) ; U10.L4@190.597,336.06 190.993,336.457 v3(190.995,336.457) ; U8.L4@202.057,336.06 202.453,336.457 v4(202.456,336.457)
  L1 w0.155: R46.1@158.737,333.611 v1(159.982,333.611)
  L1 w0.25: v3(188.593,335.664) 188.997,335.26
  L12 (Sign) w0.092: 165.251,335.39 166.001,335.39 166.728,336.118 167.736,336.118 v3(168.075,336.457) 168.471,336.06 172.682,336.06 173.297,335.445 174.206,335.445 175.143,335.445 ccw(c175.143,335.535) 175.233,335.535 ; 175.233,335.524 cw(c175.322,335.524) 175.322,335.613 175.591,335.613 cw(c175.591,335.524) 175.681,335.524 175.681,335.445 175.681,335.356 ccw(c175.77,335.356) 175.77,335.266 176.039,335.266 ccw(c176.039,335.356) 176.128,335.356 cw(c176.218,335.356) 176.218,335.445 176.352,335.445 176.564,335.657 177.394,335.657 177.797,336.06 179.139,336.06 v3(179.535,336.457) 179.932,336.06 184.472,336.06 185.272,335.26 186.919,335.26 187.33,335.26 ccw(c187.33,335.33) 187.399,335.33 187.399,335.405 cw(c187.469,335.405) 187.469,335.474 187.676,335.474 cw(c187.676,335.405) 187.746,335.405 187.746,335.26 187.746,335.116 ccw(c187.815,335.116) 187.815,335.047 188.022,335.047 ccw(c188.022,335.116) 188.092,335.116 188.092,335.191 cw(c188.161,335.191) 188.161,335.26 188.265,335.26 188.997,335.26 189.797,336.06 190.599,336.06 v3(190.995,336.457) 191.461,335.991 192.261,335.191 193.599,335.191 193.904,335.496 194.475,335.496 194.691,335.28 198.999,335.28 199.014,335.28 199.238,335.28 200.048,335.28 ccw(c200.048,335.37) 200.138,335.37 200.138,335.467 cw(c200.227,335.467) 200.227,335.556 200.496,335.556 cw(c200.496,335.467) 200.585,335.467 200.585,335.28 200.585,334.989 ccw(c200.675,334.989) 200.675,334.9 200.944,334.9 ccw(c200.944,334.989) 201.033,334.989 201.033,335.19 cw(c201.123,335.19) 201.123,335.28 201.257,335.28 201.279,335.28 201.99,335.991 v4(202.456,336.457)
  L12 (Sign) w0.151: v1(159.982,333.611) 163.225,333.611 165.005,335.39 165.251,335.39
  L3 (Sign) w0.092: v2(185.884,318.027) 185.884,319.158 190.043,323.317 190.113,323.387 ccw(c190.043,323.457) 190.113,323.527 189.79,323.85 cw(c189.861,323.92) 189.79,323.99 189.931,324.13 cw(c190.001,324.06) 190.071,324.13 190.464,323.738 191.033,323.168 ccw(c191.103,323.239) 191.173,323.168 191.314,323.309 ccw(c191.244,323.379) 191.314,323.449 190.745,324.018 190.352,324.411 cw(c190.422,324.481) 190.352,324.551 190.492,324.692 cw(c190.562,324.622) 190.633,324.692 191.025,324.299 191.595,323.73 ccw(c191.665,323.8) 191.735,323.73 191.875,323.87 ccw(c191.805,323.94) 191.875,324.011 191.306,324.58 190.913,324.973 cw(c190.983,325.043) 190.913,325.113 191.054,325.253 cw(c191.124,325.183) 191.194,325.253 191.587,324.861 192.14,324.307 ccw(c192.21,324.377) 192.281,324.307 192.421,324.447 ccw(c192.351,324.518) 192.421,324.588 191.867,325.141 191.475,325.534 cw(c191.545,325.604) 191.475,325.674 191.615,325.815 cw(c191.685,325.745) 191.755,325.815 192.099,325.471 ccw(c192.148,325.52) 192.197,325.471 192.321,325.594 192.321,333.664 192.83,334.173 192.83,334.29 193.072,334.532 193.072,335.79 193.084,335.802 193.084,335.813 193.247,335.976 193.258,335.976 193.26,335.978 193.262,335.978 193.365,336.08 196.258,336.08 201.263,341.085 202.309,341.085 203.057,340.338 203.057,338.206 202.818,337.966 202.818,337.9 202.703,337.785 202.703,337.464 202.777,337.39 202.777,337.124 202.703,337.05 202.703,336.704 v4(202.456,336.457)
DDR4_CS_N1: U1.AD29